# Altium PCB Grantv3.PcbDoc (part 4 of 5)
Units mil, origin at the board's own origin, x right, y up, seen from the top; angles counter-clockwise.
Board outline 3031.03 x 2829.03 mil, 2 copper layers (Top Layer, Bottom Layer); 187 components, 111 nets, 634 pads, 178 vias.
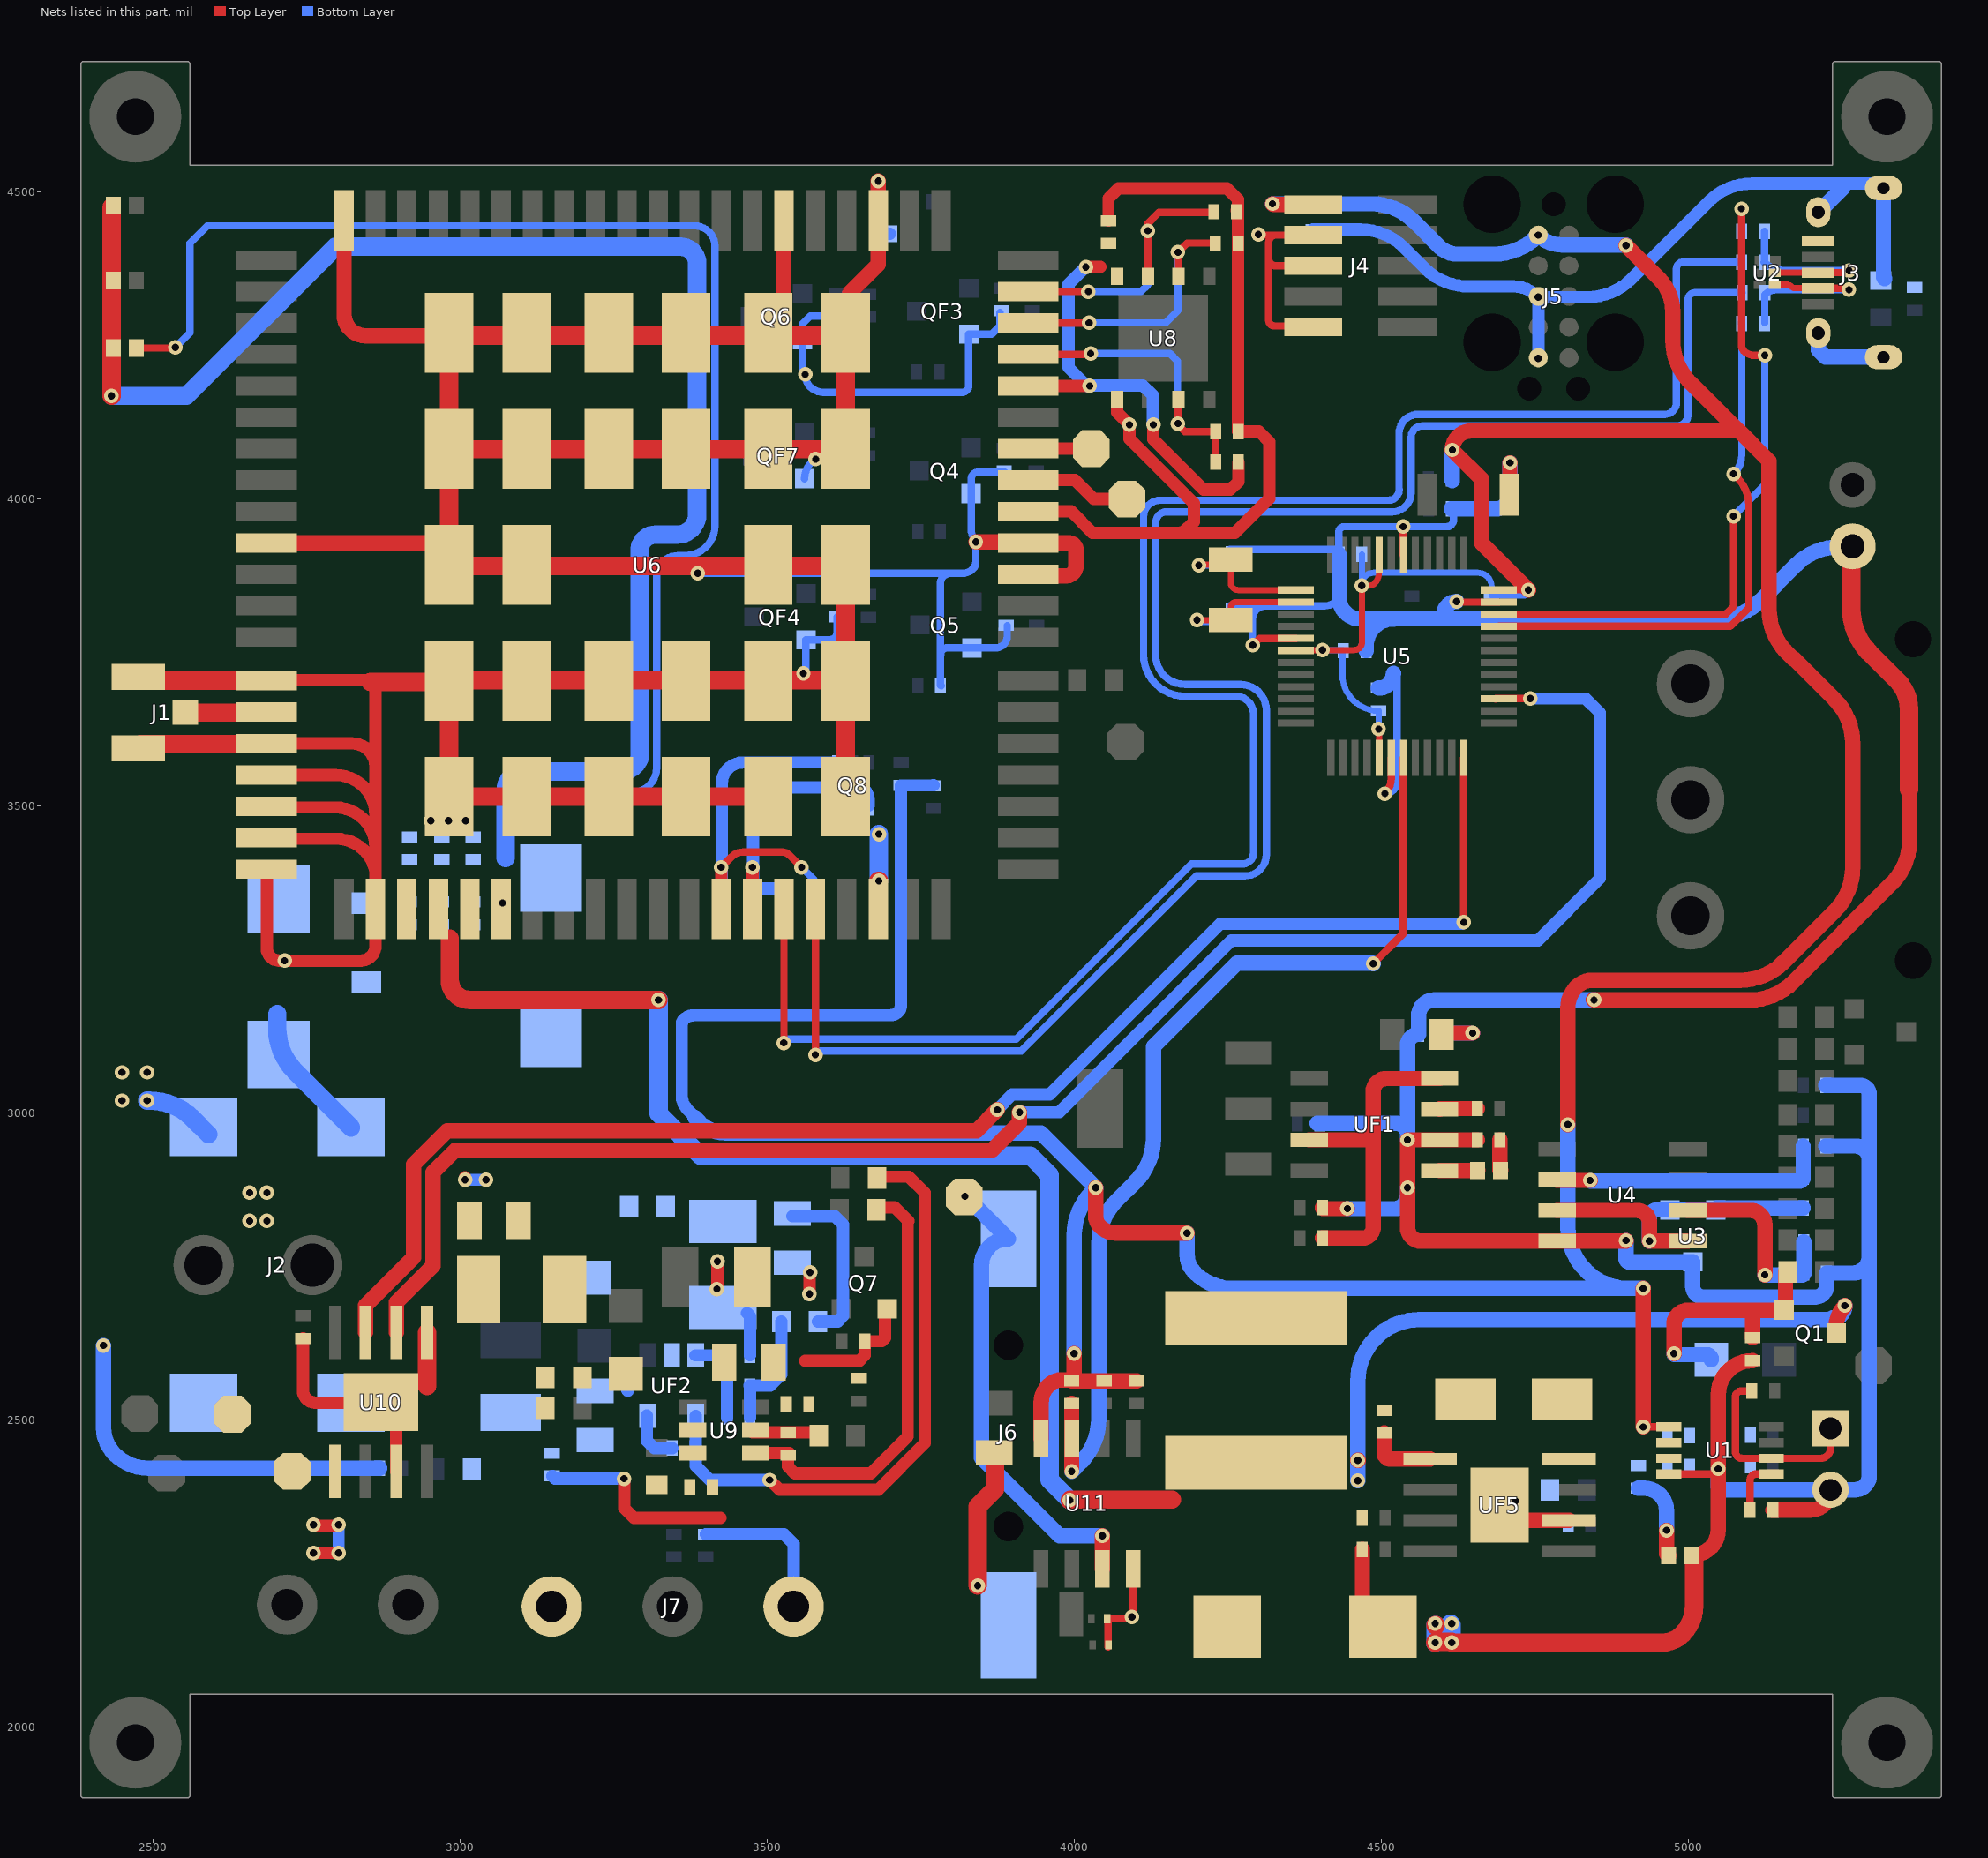
[diagram p2: the nets of this part, all layers, seen from the top]

## Via types
v1: diameter 23.62, hole 11.81, Top Layer to Bottom Layer, 178 vias

## Nets (pads, with @x,y where several pads share a name; then routed paths per layer and width w, separated by ;. In a path a pad name is that pad's centre, name@x,y a point inside that pad or via, vN(x,y) a via of type N, cw(c..) or ccw(c..) an arc to the next point about the centre after c; other vN are vias at no path point) (continued)
GND: C1.2 C2.2 C3.2 C3Z.2 C4.2 C4Z.1 C5.1 C6.2 C10.2 C11.2 C12.2 C13.2 C14.2 C15.2 C16.1 C17.1 C18.2 C19.2 C20.2 C21.2 C22.2 C23.2 C24.2 C25.2 C26.2 C27.1 C29.2 C30.2 C31.2 C36.2 C37.2 C38.1 C40.2 CC.2 CD.2 CE.2 CF1.2 CF2.2 CF3.2 CF6.1 CF.2 CR1.2 CX1.1 CX2.1 D2.1 D4.2 DF1.2 J1.2 J1.3 J2.2 J2.3 J3.5 J3.MH1 J3.MH2 J3.MH3 J3.MH4 J4.3 J4.5 J4.9 J5.3 J5.5 J6.2 J7.3 LED1.2 P1.2 P12.1 P17.2 Q4.2 Q5.2 Q6.2 Q7.2 QF3.2 QF4.2 QF7.2 R2.1 R5.2 R8.2 R16.2 R17.2 R19.2 R22.1 R26.2 R28.2 R101.2 RF4.2 RF6.1 RF8.2 RF11.2 RF14.2 RF16.1 RP2.2 RP4.2 SW1.2 U1.4 U3.3 U4.4 U5.5 U5.18 U5.35 U5.42 U6.8 U6.9 U6.19 U6.22 U6.36 U6.46 U6.48 U6.50 U6.51 U6.52 U6.53 U6.54 U6.56 U6.72 U6.85 U6.86 U6.87 U6.88 U6.89 U6.90 U6.91 U6.92 U6.93 U6.94 U6.95 U6.96 U6.97 U6.98 U6.99 U6.100 U6.101 U6.102 U6.103 U6.104 U6.105 U6.106 U6.107 U6.108 U6.109 U6.110 U6.111 U6.112 U9.2 U10.1 U10.7 U10.9 U11.4 UF1.6 UF2.2 UF5.6 UF5.9 | length 22599.9
  Top Layer w12: CX1.1@4055,2130 CX2.1@4055,2171 ; CX2.1@4055,2175 CX2.1@4055,2171 ; v1@4085,2176 4060,2176 ccw(c4060,2171) CX2.1@4055,2171 ; v1@4096,2187 U11.4@4096,2257.4 ; v1@4292,3762 v1(4291,3762) 4302,3773 U5.5@4361,3773 ; v1@4301.24,4430 4329,4430 ; J4.9@4387,4282 4326,4282 cw(c4326,4291) 4317,4291 4317,4391 ; J4.5@4389.46,4380 4328,4380 cw(c4328,4391) 4317,4391 ; J4.3@4389.46,4430 4329,4430 ; v1(4506,3520) ccw(c4480.62,3545.38) 4516.51,3545.38 U5.18@4516.51,3578.12 ; v1(4536,3955) 4536.2,3954.8 U5.42@4536.2,3908.83 ; v1(4623,3833) 4622.06,3832.06 U5.35@4691.71,3832.06 ; U1.4@4968.54,2411.61 v1@5049,2411.61 ; 4317,4391 4317,4418 cw(c4329,4418) 4329,4430
  Top Layer w20: U6.50@2683,3602 2823.51,3602 cw(c2823.51,3563.51) 2862,3563.51 ; U6.54@2684.91,3396.96 2684.91,3268.6 ccw(c2705.52,3268.6) 2705.52,3248 v1(2714,3248) 2838,3248 ccw(c2838,3272) 2862,3272 U6.56@2862,3325 ; U6.52@2684.91,3497.5 2796.5,3497.5 cw(c2796.5,3432) 2862,3432 ; U6.51@2684.91,3550.5 2796.5,3550.5 cw(c2796.5,3485) 2862,3485 ; U6.48@2685,3705 2844,3705 cw(c2844,3687) 2853.95,3702 cw(c2844,3687) 2862,3687 2862,3563.51 ; U6.53@2685.91,3446.5 2797.5,3446.5 cw(c2797.5,3381) 2862.08,3391.95 ; R101.2@2744,2632.5 2744,2547.63 ccw(c2763.63,2547.63) 2763.63,2528 U10.9@2870,2528 ; 2862,3497 2862,3563.51 ; U6.56@2862.08,3332 2862.08,3391.95 ; 2862.08,3502 2862.08,3391.95 ; U10.9@2894,2525 2896,2523 U10.7@2896,2415.81 ; v1(3267,2404) 3267,2356 3283,2340 3424,2340 ; v1(3418,2713) 3419,2713 v1(3419,2758) ; 3562,2596 3650,2596 3659,2605 R26.2@3659,2625 ; v1(3569,2705) 3569,2739 v1(3570,2740) ; R26.2@3659,2628 3687,2628 3692,2633 Q7.2@3692,2681
  Top Layer w25: U6.46@2684.91,3928.46 U6.87@2971.46,3928.46 ; U6.36@2810.9,4454.05 2810.9,4300.72 ccw(c2845.61,4300.72) 2845.61,4266 U6.89@2980,4266 ; U6.107@3520,4313 3527.43,4320.43 U6.22@3527.43,4454.05 ; U6.112@3635,4303 3635,4336 3680.98,4381.98 U6.19@3680.98,4454.05 v1(3681,4518) ; v1(3840,3930) 3923.53,3930 cw(c3923.53,3928.46) U6.9@3925.07,3928.46 3992.11,3928.46 cw(c3992.11,3917.57) 4003,3917.57 4003,3891 cw(c3987,3891) 3987,3875 U6.8@3930,3875 ; RF4.2@4404.5,2846 ccw(c4406.5,2846) 4406.5,2844 v1(4445,2844) ; RF6.1@4469.5,2289 4469.5,2196.27 ccw(c4502.77,2196.27) CF3.2@4502.77,2163 ; v1@4543,2877 4543,2813.17 ccw(c4565.17,2813.17) 4565,2791 ; v1(4543,2878) v1(4543,2956) UF1.6@4595.3,2956 R5.2@4656.56,2956 ; UF5.9@4693,2361 ccw(c4718,2361) 4718,2336 UF5.6@4806.19,2336 ; SW1.2@4709.5,4007 4709.5,4059 v1(4710,4059) ; v1@4846,3184 v1(4847,3184) 5100.58,3184 ; v1(4899,2792) cw(c4898,2792) 4898,2791 U4.4@4786.7,2791 4565.17,2791 ; LED1.2@5008,2280 ccw(c5008,2321) 5049,2321 5049,2411.61 v1(5049,2420) 5049,2540.5 cw(c5105,2540.5) R2.1@5105,2596.5 ; 5105,3184 5100.58,3184 ; C5.1@5138,2353 5199,2353 ccw(c5199,2386) P1.2@5232,2386 ; 5361,3527 5361,3444.42 cw(c5261,3444.42) 5360,3430.31 cw(c5261,3444.42) 5331.71,3373.71 5171.29,3213.29 cw(c5100.58,3284) 5100.58,3184 ; 4565,2791 ccw(c4565.17,2813.17) 4565.17,2791 ; 4565,2791 4565.17,2791
  Top Layer w30: J1.3@2475.65,3593.93 cw(c2482.72,3593.93) J1.3@2482.72,3601 ; J1.2@2475.65,3710.07 ccw(c2481.72,3710.07) J1.2@2481.72,3704 ; J1.3@2482,3601 J1.3@2482.72,3601 ; J1.2@2501,3704 U6.48@2684.91,3704.05 ; U6.50@2691,3601 J1.3@2482.72,3601 ; 2853.95,3702 U6.86@2982.16,3702 ; 2946,2555 U10.1@2946,2642.19 ; U6.87@2982.16,3893.02 U6.88@2982.16,4082 U6.89@2982.16,4270.98 ccw(c2987.13,4270.98) 2987.13,4266 3628.69,4266 ccw(c3631,4263.83) 3627.83,4263.83 U6.111@3627.83,4082 ; U6.87@2984.13,3891 U6.110@3625.69,3891 ; U6.88@2985.13,4081 U6.111@3626.69,4081 ; U6.103@3501.84,3515.07 U6.99@3367.98,3515.07 U6.95@3242,3515.07 U6.90@3108.14,3515.07 U6.85@2982.16,3515.07 U6.86@2982.16,3702 ; U6.108@3627.83,3515.07 U6.109@3627.83,3704.05 U6.109@3627.83,3705 ; U6.110@3627.83,3877.28 U6.109@3627.83,3705 ; U6.72@3680.98,3332 3680.98,3376.98 cw(c3682,3376.98) v1(3682,3378) ; v1(3843,2230) 3843,2359 3871,2387 C40.2@3871,2447 ; v1(4588,2137) 4589,2138 v1@4615,2138 ; v1@4589,2165 v1@4589,2166 ; v1(4615,2137) 4957.2,2137 ccw(c4957.2,2184.8) 4991,2151 ccw(c4945.13,2196.87) 5010,2196.87 LED1.2@5010,2278 ; P17.2@5266,3922 5266,3820.42 ccw(c5366,3820.42) 5295.29,3749.71 5340.2,3704.8 cw(c5292.4,3657) 5360,3657 5360,3527 ; U6.86@2982.16,3702 U6.86@2982.16,3704.05 cw(c2983.11,3704.05) 2983.11,3705 U6.109@3627.83,3705
  Bottom Layer w12: v1(3387,3879) 3799,3879 ; CF6.1@3508.5,3709 3545.1,3709 ccw(c3545.1,3726.9) 3563,3726.9 QF4.2@3563,3771 ; QF7.2@3561,4033 cw(c3599,4033) 3599,4071 RF14.2@3611,4071 ; QF4.2@3563.32,3770.6 3601,3770.6 ccw(c3601,3783.6) 3614,3783.6 RF11.2@3614,3808 ; R19.2@3612,4298 3570,4298 3557.32,4285.32 Q6.2@3557.32,4259.6 3557.32,4207.68 v1(3562,4203) ccw(c3591,4203) 3591,4174 3818,4174 ccw(c3818,4184.32) 3828.32,4184.32 QF3.2@3828.32,4268.6 3865.6,4268.6 3879,4282 RF8.2@3879,4304 ; 3782.81,3746.86 cw(c3793.56,3746.86) 3793.56,3757.6 Q5.2@3833.32,3757.6 3872.16,3757.6 ccw(c3872.16,3776.44) 3891,3776.44 R17.2@3891,3794 ; C27.1@3784,3696 cw(c3784,3698) 3782,3698 3782,3862 cw(c3799,3862) 3799,3879 ; v1@3840,3929 3840,3898.07 cw(c3822.93,3898.07) 3835,3886 cw(c3818.1,3902.9) 3818.1,3879 3799,3879 ; v1@3840,3932 cw(c3858.53,3950.53) 3832.32,3950.53 Q4.2@3832.32,4008.6 3832.32,4032.32 cw(c3844,4032.32) 3844,4044 R16.2@3887,4044 ; C17.1@4254,3826 4313,3826 ; C16.1@4254,3918 4427,3918 cw(c4427,3912) 4430.53,3916.86 ccw(c4475,3910) C14.2@4430,3910 ; v1@4290,3762 4290,3803 cw(c4313,3803) 4313,3826 ; C14.2@4431,3905 4431,3946 cw(c4440,3946) 4440,3955 v1(4536,3955) 4607,3955 ccw(c4607,3966) 4618,3966 C18.2@4618,3982 ; 4435,3853 cw(c4408,3853) 4431.5,3839.71 cw(c4408,3853) 4408,3826 4313,3826 ; v1(4506,3520) ccw(c4506,3540) 4526,3540 4526,3708
  Bottom Layer w20: CF.2@3150,2408.5 3154.5,2404 v1(3267,2404) ; 3272,2548 3273,2547 ; R28.2@3400,2313.5 3527.5,2313.5 3543,2298 J7.3@3543,2196 J7.3@3543,2192 ; C4Z.1@3467,2674 3472,2669 RF16.1@3472,2605 ; v1@3569,2704 v1(3569,2705) ; v1(3681,4518) 3681,4454.22 ccw(c3703.27,4454.22) 3687.52,4438.48 3690,4436 ccw(c3699.66,4445.66) D4.2@3699.66,4432 ; C29.2@4389,4439 4466.58,4439 cw(c4466.58,4339) 4537.29,4409.71 4571.21,4375.79 ccw(c4641.92,4446.5) 4626.2,4347.74 ccw(c4641.92,4446.5) 4641.92,4346.5 4715.17,4346.5 cw(c4715.17,4290.17) v1@4755,4330 ; v1(4756,4229) v1(4756,4329) 4836.58,4329 ccw(c4836.58,4429) 4907.29,4358.29 5033.71,4484.71 cw(c5104.42,4414) 5104.42,4514 J3.MH4@5322.59,4514
  Bottom Layer w25: v1(2419,2621) 2419,2487.46 ccw(c2480.46,2487.46) 2437,2444 ccw(c2492.53,2499.53) 2492.53,2421 CR1.2@2869,2421 ; C10.2@4396,2983 4524,2983 cw(c4524,2964) v1@4543,2964 ; C14.2@4431.5,3910 4431.5,3839.71 ccw(c4466.71,3839.71) 4466.71,3804.5 4520,3804.5 ; v1(4445,2844) 4522.93,2844 ccw(c4522.93,2861.07) 4535,2849 ccw(c4515.69,2868.31) 4543,2868.31 v1(4543,2878) ; C13.2@4475.5,3753 4475.5,3760 cw(c4520,3760) 4520,3804.5 ; C12.2@4496,3692 ccw(c4496,3716) 4520,3716 ; v1(4543,2956) v1@4543,2964 ; C18.2@4614.5,3984 4686,3984 ccw(c4686,4008) 4710,4008 v1(4710,4059) ; v1(4623,3833) ccw(c4623,3812) 4602,3812 4602,3805.5 ; v1(4847,3184) 4587,3184 ccw(c4587,3158) 4561,3158 C6.2@4561,3128 ccw(c4561,3110) 4543,3110 v1@4543,2964 ; v1(4899,2792) 4899,2762.35 ccw(c4904,2762.35) 4904,2757.35 U3.3@5007.6,2757.35 5007.6,2717.56 ccw(c5025.16,2717.56) 5025.16,2700 5207,2700 ccw(c5207,2718.5) 5225.5,2718.5 R8.2@5225.5,2739 5268,2739 ccw(c5268,2766) 5295,2766 ; v1(5049,2420) 5049,2393 ccw(c5056,2393) 5056,2386 P1.2@5232,2386 5272,2386 ccw(c5272,2409) 5295,2409 5295,2766 ; J3.MH1@5212,4270 5212,4243 5223.98,4231.02 J3.MH3@5318.3,4231.02 J3.MH3@5321,4231.02 ; J3.MH2@5212,4467.24 5212.24,4467.24 5251.61,4506.61 ; RP2.2@5224.5,2946 5272.34,2946 cw(c5272.34,2923.34) 5295,2923.34 ; RP4.2@5224.5,3045 5280,3045 cw(c5280,3030) 5295,3030 5295,2923.34 ; P17.2@5268,3922 5246.42,3922 ccw(c5246.42,3822) 5175.71,3892.71 5117.79,3834.79 cw(c5047.08,3905.5) 5047.08,3805.5 C11.2@4680,3805.5 4602,3805.5 ; J3.MH4@5318.3,4506.61 5318.3,4363.11 ccw(c5324.11,4363.11) C31.2@5320,4359 ; 4520,3804.5 cw(c4521,3804.5) 4521,3805.5 4602,3805.5 ; 5295,2766 5295,2923.34
  Bottom Layer w30: v1(2490,3020) 2493.58,3020 cw(c2493.58,2920) 2564.29,2990.71 J2.2@2590,2965 ; 2702,3161 2702,3137.99 ccw(c2802,3137.99) 2731.29,3067.28 J2.3@2822.16,2976.41 ; v1(3682,3378) v1(3682,3454) ; v1(4588,2137) 4589,2138 v1@4589,2166 ; v1@4613,2168 4615,2166 v1@4615,2138
  other v1: 4588,2168 4615,2168 4094,2179 4719,2368 2449,3020 2449,3066 2490,3066 2952,3476 2981,3476 3009,3476 3559,3716 3579,4065 4300,4431
GSM_D+: RF24.1 U6.69 | length 3144.3
  Top Layer w12: v1(3527,3114) 3527.43,3114.43 U6.69@3527.43,3332
  Bottom Layer w12: v1@3526,3115 3531.37,3120.37 3905.98,3120.37 4190.98,3405.37 4274,3405.37 ccw(c4274,3423.37) 4292,3423.37 4292,3650 ccw(c4263.37,3650) 4263.37,3678.63 4181,3678.63 cw(c4181,3746.63) 4113,3746.63 4113,3971 cw(c4140,3971) 4140,3998 4512,3998 ccw(c4512,4015.44) 4529.44,4015.44 ; 4529.28,4015.44 4529.28,4107 cw(c4560.28,4107) 4560.28,4138 4962,4138 ccw(c4962,4157) 4981,4157 4981,4375 cw(c4992,4375) 4992,4386 5013,4386 RF24.1@5087.5,4386
GSM_D-: RF21.1 U6.70 | length 3082
  Top Layer w12: v1(3578.61,3094.61) U6.70@3578.61,3332
  Bottom Layer w12: v1@3578,3096 3583,3101 3914,3101 4199,3386 4278,3386 ccw(c4278,3421) 4313,3421 4313,3655.68 ccw(c4270.68,3655.68) 4270.68,3698 4181,3698 cw(c4181,3746.45) 4132.55,3746.45 4132.55,3952 ; 4133,3952 4133,3961.69 cw(c4150.31,3961.69) 4150.31,3979 4517.74,3979 ; 4517.74,3979.04 ccw(c4517.74,4010.3) 4549,4010.3 4549,4101.07 cw(c4566.93,4101.07) 4566.93,4119 4981,4119 ccw(c4981,4138.31) 4994.33,4124.34 ; 4994,4124 ccw(c4979.51,4138.49) 4994.33,4124.34 ; 5000,4324 5000,4138.49 cw(c4979.51,4138.49) 4999.77,4135.4 cw(c4979.51,4138.49) 4994.33,4124.34 ; 5000,4325 cw(c5011,4325) 5011,4336 RF21.1@5088,4336
IN1-: RP1.1 RP2.1 U4.2 | length 456.4
  Top Layer w25: U4.2@4786.7,2891 ccw(c4787.7,2891) 4787.7,2890 v1(4840.5,2890)
  Bottom Layer w25: v1(4840.5,2890) cw(c4840.5,2889) 4841.5,2889 5181.5,2889 ccw(c5181.5,2895) RP1.1@5187.5,2895 RP2.1@5187.5,2946
IN2-: R6.1 R8.1 U4.6 | length 336.8
  Top Layer w25: U4.6@4999.3,2841 5101.51,2841 cw(c5101.51,2817.51) 5125,2817.51 v1(5125,2736)
  Bottom Layer w25: v1(5125,2736) 5185.5,2736 ccw(c5185.5,2739) R8.1@5188.5,2739 R6.1@5188.5,2790
IN+: R7.1 U3.1 U3.2 U4.3 U4.5 | length 551.5
  Top Layer w25: U4.3@4786.7,2841 4916.71,2841 cw(c4916.71,2820.71) 4937,2820.71 v1(4937,2791) U4.5@4999.3,2791
  Bottom Layer w25: v1(4937,2791) 4937,2829 cw(c4950,2829) 4950,2842 U3.1@4970.2,2842 U3.2@5045,2842 cw(c5048,2842) 5048,2845 R7.1@5187.5,2845
MCU_D+: RF23.1 U5.34 | length 1124.3
  Top Layer w12: U5.34@4689.71,3811.69 5060.82,3811.69 5074,3824.87 5074,3829 ; 5074,3831 v1(5074,3972) ; v1(5087,4473) 5087,4250.66 ccw(c5100.66,4250.66) 5091,4241 ccw(c5107.9,4257.9) 5107.9,4234 v1(5125,4234)
  Bottom Layer w12: v1(5074,3972) 5125,4023 v1(5125,4234) ; v1(5087,4473) 5087.21,4472.79 5087.5,4472.79 RF23.1@5087.5,4436
MCU_D-: RF22.1 U5.33 | length 896
  Top Layer w12: U5.33@4691.71,3792.69 5068.69,3792.69 5099,3823 5099,3989 ccw(c5033.82,3989) 5079.91,4035.09 v1(5074,4041)
  Bottom Layer w12: v1@5074,4040 ccw(c5041.41,4072.59) 5087.5,4072.59 RF22.1@5087.5,4286 ; RF22.1@5087,4286 RF22.1@5087,4287
MFP: R25.1 U5.19 U11.7 | length 1613.7
  Top Layer w12: v1(4487,3243) 4536,3292 U5.19@4536,3578
  Top Layer w25: v1@3996,2417 U11.7@3996,2470 R25.1@3996,2526.5
  Bottom Layer w25: v1(3996,2416) 4010.71,2430.71 ccw(c3940,2501.42) 4040,2501.42 4040,2786.58 cw(c4140,2786.58) 4069.29,2857.29 4099.71,2887.71 ccw(c4029,2958.42) 4129,2958.42 4129,3108 4146.5,3125.5 4265,3244 4486,3244 v1(4487,3243)
NetC5_2: C5.2 U1.5 | length 89
  Top Layer w12: C5.2@5101,2353 5101,2402 cw(c5110.61,2402) 5110.61,2411.61 U1.5@5135.46,2411.61
NetCF7_1: CF7.1 UF5.1 | length 113
  Top Layer w25: CF7.1@4505,2478.5 4505,2446 ccw(c4515,2446) 4515,2436 UF5.1@4579.81,2436
NetCF17_2: CF17.2 RF31.1 SB12.1 | length 197.5
  Bottom Layer w20: RF31.1@3471,2556 RF31.1@3472,2556 ; CF17.2@3472,2504 RF31.1@3472,2555 RF31.1@3472,2556 ; SB12.1@3523,2660 3523,2574 3505,2556 RF31.1@3472,2556
NetD1_A: D1.A Q1.1 R2.2 SB1.2 | length 421.2
  Top Layer w25: v1(4977,2608) 4977,2655 cw(c5000.41,2655) 5000.41,2678.41 5117.41,2678.41 ; R2.2@5105,2633.5 5105,2666 cw(c5117.41,2666) 5117.41,2678.41 ; Q1.1@5156.68,2678.41 5117.41,2678.41 ; Q1.1@5158.68,2678.41 SB1.2@5158.68,2741
  Bottom Layer w25: v1(4977,2608) ccw(c4979,2608) 4979,2606 5029.88,2606 cw(c5029.88,2598) D1.A@5037.88,2598
NetD3_K: D3.K SB11.1
NetD3Z_K: D3Z.K SB11x.1
NetLED1_1: LED1.1 R1.1 | length 142.1
  Top Layer w25: v1(4965,2320) 4965,2283 ccw(c4969,2283) LED1.1@4969,2279
  Bottom Layer w25: R1.1@4919,2388.5 4928.5,2388.5 cw(c4928.5,2352) 4965,2352 v1(4965,2320)
NetLED2_2: LED2.2 R5.1 | length 50.6
  Top Layer w25: R5.1@4693.56,2956 4693.56,2907.14 ccw(c4694.7,2907.14) LED2.2@4694.7,2906
NetLED3_2: LED3.2 R10.2 | length 2254.2
  Top Layer w12: LED3.2@2472.64,4246 2536,4246 v1(2536,4247)
  Bottom Layer w12: v1(2536,4247) 2560,4271 2560,4417 2588,4445 3382,4445 cw(c3382,4412) 3415,4412 3415,3957 cw(c3366,3957) 3366,3908 3355,3908 ccw(c3355,3873) 3320,3873 3320,3562 cw(c3280.5,3562) 3280.5,3522.5 R10.2@3127,3522.5